# Altium PCB Copy of MultiVibrateur.PcbDoc
Units mil, origin at the board's own origin, x right, y up, seen from the top; angles counter-clockwise.
Board outline 1220 x 820 mil, 2 copper layers (Top Layer, Bottom Layer); 9 components, 6 nets, 20 pads, 2 vias.
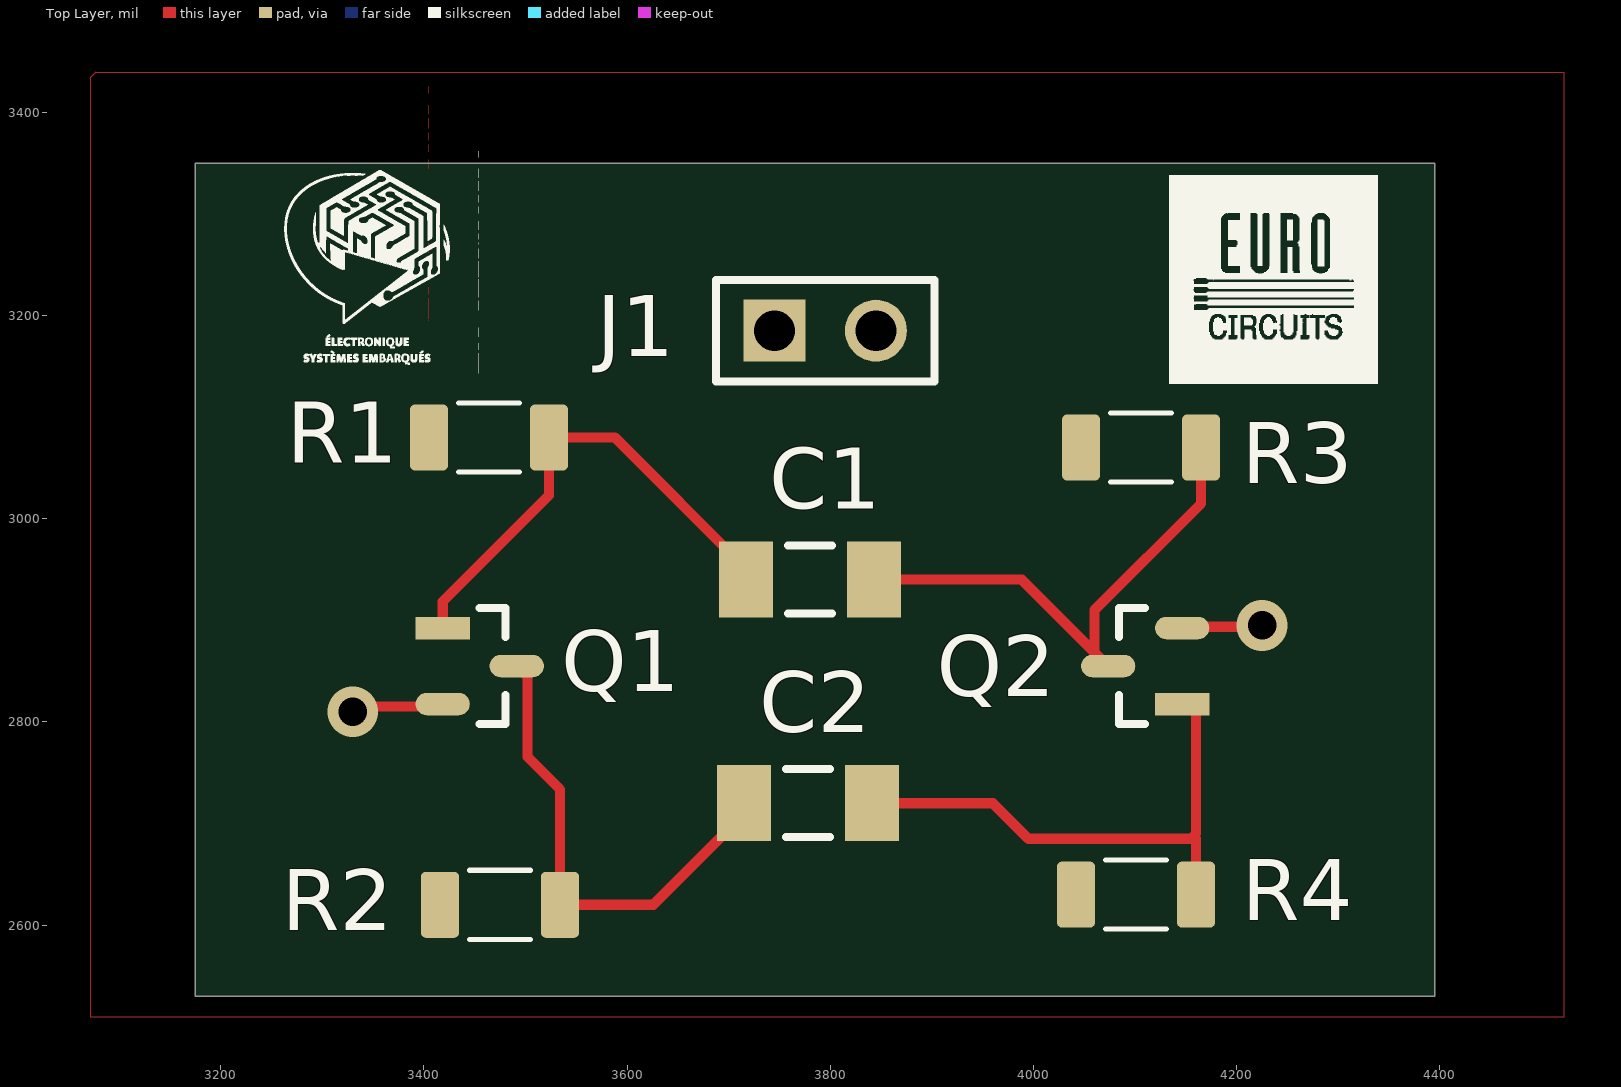
[diagram p0: Top Layer view]
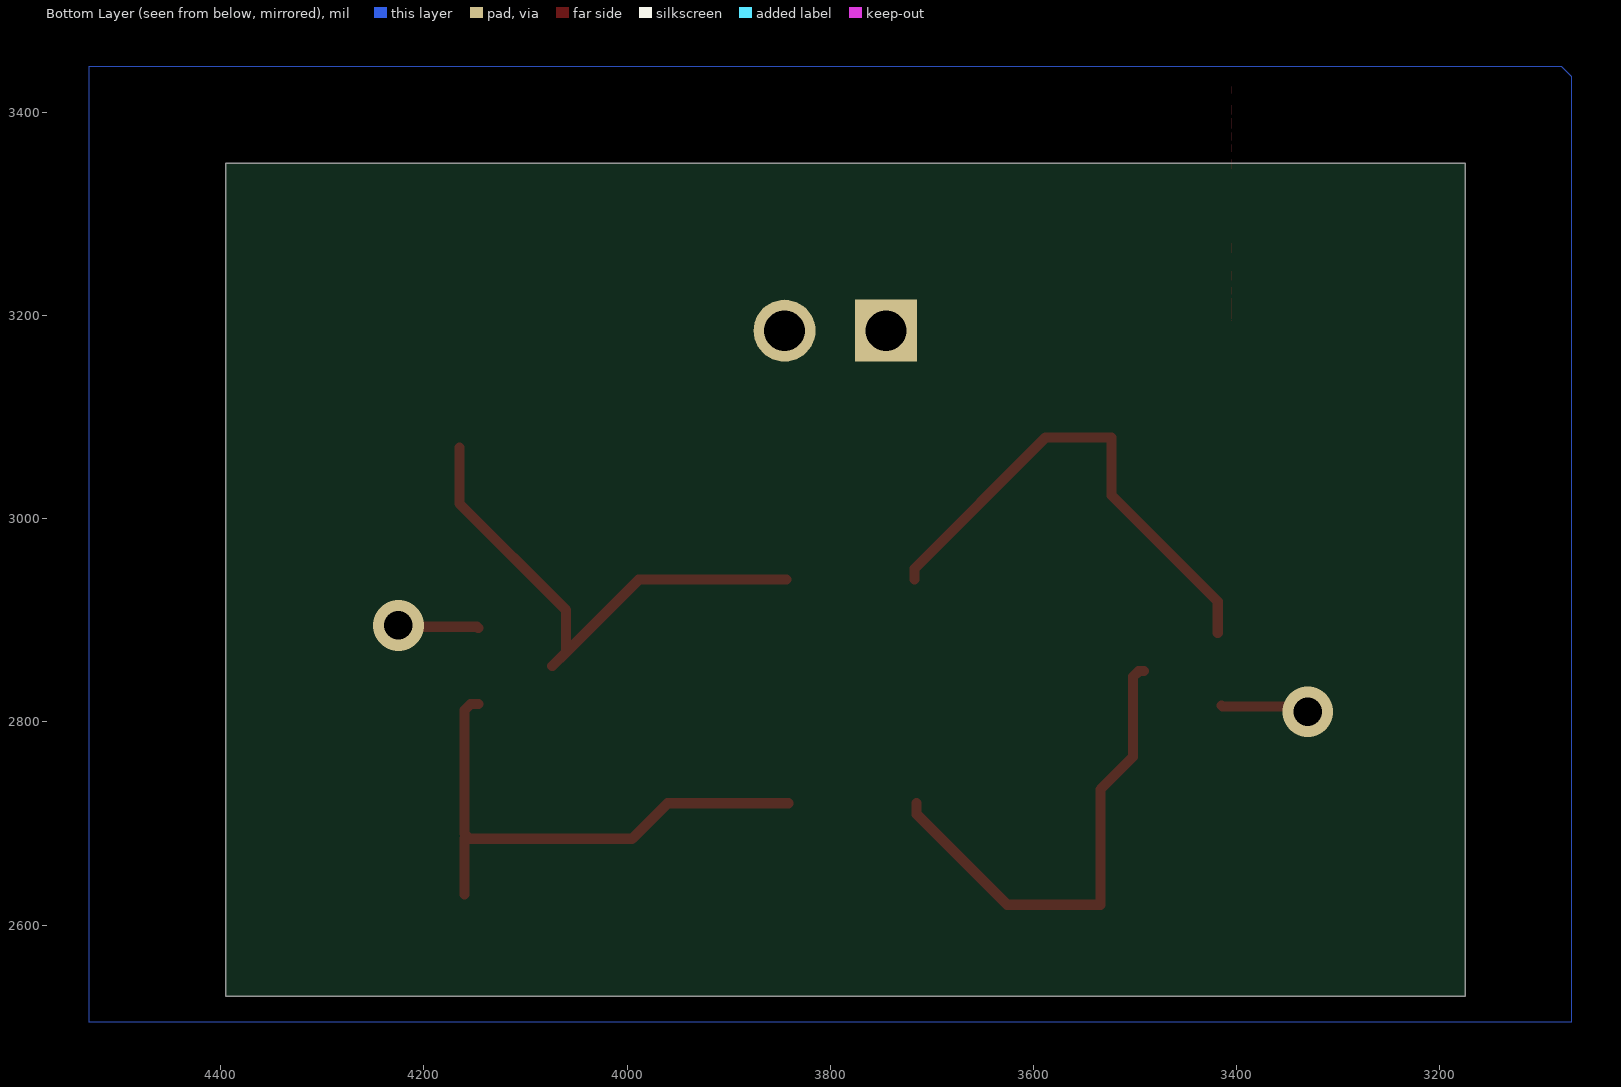
[diagram p1: Bottom Layer view, seen from below]

## Layer stack, top to bottom
Top Solder: solder mask 0.4, Solder Resist, Dk 3.5
Top Layer: signal copper 1.4
Dielectric 1: dielectric 12.6, FR-4, Dk 4.8
Bottom Layer: signal copper 1.4
Bottom Solder: solder mask 0.4, Solder Resist, Dk 3.5

## Board outline
3175,2530 3175,3350 4395,3350 4395,2530

## Design rules (kind name [scope] priority, off if disabled: settings)
Clearance [All] p1: gap=10 ignorepadtopadclearanceinfootprint=FALSE
PolygonConnect [All] p1: connectstyle=Relief reliefconductorwidth=10 reliefentries=4 polygonreliefangle="90 Angle" airgapwidth=10
RoutingVias [All] p1: holewidth=28 width=50 viastyle="Through Hole" minholewidth=28 minwidth=50 maxholewidth=28 maxwidth=50
SolderMaskExpansion [All] p1: expansion=0 istentingtop=FALSE
SupplyNets "Schematic Supply Nets_1" [InNet('12V')] p1: voltage=12.00
SupplyNets "Schematic Supply Nets" [InNet('GND')] p2: voltage=0.000
Width [All] p1: maxlimit=10 minlimit=10 preferedwidth=10
30 further rules are at their usual default settings.

## Classes and differential pairs
net class Power: GND

## Components (designator, comment, footprint, x,y, rotation, side; value= is the part's Value field where it differs from the comment)
C1 "22nF" CAPACITOR_1206 3780,2940 r0 top value=100nF
C2 "22nF" CAPACITOR_1206 3777.99,2720 r0 top value=100nF
J1 "2 Pins header" HEADER_2PIN_2_54 3745,3185 r0 top
Q1 "Transistor" TRANSISTOR_BC847 3455,2855 r0 top
Q2 "Transistor" TRANSISTOR_BC847 4110,2855 r180 top
R1 "100k" RESISTOR_1206 3464.06,3080 r180 top
R2 "1k" RESISTOR_1206 3475,2620 r180 top
R3 "1k" RESISTOR_1206 4105.94,3070 r180 top
R4 "100k" RESISTOR_1206 4100.94,2630 r180 top

## Footprints (in the part's own frame and the unit in brackets; to place one, negate y for a bottom-side part, rotate by r counter-clockwise, add the part's x,y. Pads: shape width x height; smd on the part's side, far side on the other; paste and mask are expansions set on the pad)
CAPACITOR_1206 [mm] "Chip Capacitor, Body 3.2x1.6mm, Height 1.7mm, IPC Low Density"
  rect 1.35x1.9 smd: 1(-1.6,0) 2(1.6,0)
  silkscreen extent -0.55,-0.85 0.55,0.85, body extent -1.7,-0.9 1.7,0.9, height 1.7
HEADER_2PIN_2_54 [mm] ".025 SQ Post Terminal Strip Assembly, 1x2 Pins, Vertical, 2.54mm Pitch, Male"
  rect 1.55x1.55 hole 1.02: 1(0,0)
  round 1.55 hole 1.02: 2(2.54,0)
  silkscreen extent -1.46,-1.27 4,1.27, body extent -1.4,-1.27 3.81,1.27, height 8.38
RESISTOR_1206 [mm]
  rrect25% 0.95x1.65 smd: 1(-1.5,0) 2(1.5,0)
  silkscreen extent -0.76,-0.86 0.76,0.86, body extent -1.6,-0.8 1.6,0.8, height 0.55
TRANSISTOR_BC847 [mm]
  rect 1.355x0.562 smd paste+0 mask+0: 1(-0.925,0.95)
  rrect100% 1.355x0.562 smd paste+0 mask+0: 2(-0.925,-0.95) 3(0.925,0)
  silkscreen extent 0,-1.45 0.65,1.45, body extent -1.85,-1.7 1.85,1.7, height 0.25

## Part data
C1 C2: library part Capacitor, Case-EIA=1206, Case-Metric=3216, Rated Voltage="100 V", Tolerance=Â±5%, Max Thickness="1.7 mm", Technology=SMT
J1: Manufacturer=Samtec, PartNumber=TSW-102-26-F-S, Temperature Range="-55 to 125 degC", ComponentLink1Description="Manufacturer URL", ComponentLink1URL=http://www.samtec.com, ComponentLink2Description=Datasheet, ComponentLink2URL=http://www.samtec.com/documents/webfiles/pdf/TSW_TH.PDF, ComponentLink3Description="Package Specification", ComponentLink3URL=http://www.samtec.com/documents/webfiles/cpdf/TSW-XXX-XX-XXX-X-XX-XXX-MKT.pdf, DatasheetVersion=F-214, Mounting Technology=Through-hole, Orientation=Vertical, PackageDescription=".025[0.64] SQ. Post Terminal Strip Assembly", PackageReference=TSW-102-26-XX-S, PackageVersion="DM, 8/1988", Pitch="2.54 mm", RoHS=True
R1 R2 R3 R4: library part Resistor
Q1 Q2: RoHS Compliant=Yes

## Via types
v1: diameter 50, hole 28, Top Layer to Bottom Layer, 2 vias

## Nets (pads, with @x,y where several pads share a name; then routed paths per layer and width w, separated by ;. In a path a pad name is that pad's centre, name@x,y a point inside that pad or via, vN(x,y) a via of type N, cw(c..) or ccw(c..) an arc to the next point about the centre after c; other vN are vias at no path point)
12V: J1.2 R1.2 R2.2 R3.2 R4.2
GND: J1.1 Q1.2 Q2.2 | length 167.1
  Top Layer w10: v1(3330,2810) 3335.27,2815.27 3413.84,2815.27 Q1.2@3414.86,2816.3 ; Q2.2 4147.74,2893.7 4223.7,2893.7 v1(4225,2895)
NetC1_1: C1.1 Q1.1 R1.1 | length 494.1
  Top Layer w10: Q1.1@3418.56,2887.4 3418.56,2918.56 3523.11,3023.11 R1.1 3587.83,3080 3717.01,2950.83 C1.1
NetC1_2: C1.2 Q2.3 R3.1 | length 510.7
  Top Layer w10: C1.2 3988.56,2940 4060,2868.56 ; Q2.3 4060,2868.56 ; R3.1 4165,3015 4060,2910 4060,2868.56
NetC2_1: C2.1 Q1.3 R2.1 | length 479.3
  Top Layer w10: Q1.3@3491.44,2850 3496.43,2850 3502.04,2844.39 3502.04,2765.6 3534.06,2733.59 R2.1 3625.83,2620 3715,2709.17 C2.1
NetC2_2: C2.2 Q2.1 R4.1 | length 528.2
  Top Layer w10: C2.2 3960,2720 3995,2685 4155,2685 4160,2690 4160,2811.53 4153.93,2817.6 Q2.1 ; R4.1 4160,2685

## Polygon pours and split planes (outlines as drawn)
GND on Bottom Layer "NONET_L02_P001" (solid, shelved, pour order 1): 3070,3435 3080,3445 4530,3445 4530,2505 3070,2505
12V on Top Layer "NONET_L01_P002" (solid, shelved, pour order 2): 4522.11,3439.52 4522.11,2509.52 3072.11,2509.52 3072.11,3434.52 3077.11,3439.52 3072.11,3434.52 3077.11,3439.52

## Other copper
Top Layer:
  region: 3404.91,3195 3404.91,3195.09 3405,3195.09 3405,3195
  region: 3404.91,3362.96 3404.91,3367.96 3405,3367.96 3405,3361.19 3404.91,3361.19 3404.91,3362.86
  region: 3404.91,3352.57 3404.91,3353.22 3405,3353.22 3405,3344.5 3404.91,3344.5 3404.91,3352.48
  region: 3405,3375.66 3405,3372.69 3404.91,3372.69 3404.91,3379.93 3405,3379.93 3405,3375.75
  region: 3405,3421.75 3405,3418.97 3404.91,3418.97 3404.91,3425 3405,3425 3405,3421.85
  region: 3405,3269.19 3405,3261.77 3404.91,3261.77 3404.91,3271.14 3405,3271.14 3405,3269.29
  region: 3404.91,3405.25 3404.91,3406.92 3405,3406.92 3405,3397.83 3404.91,3397.83 3404.91,3405.15
  region: 3405,3209.47 3405,3196.85 3404.91,3196.85 3404.91,3217.17 3405,3217.17 3405,3209.56
  region: 3405,3225.88 3405,3220.97 3404.91,3220.97 3404.91,3227.74 3405,3227.74 3405,3225.98
  region: 3405,3389.02 3405,3384.29 3404.91,3384.29 3404.91,3394.3 3405,3394.3 3405,3389.11
  region: 3405,3236.64 3405,3234.51 3404.91,3234.51 3404.91,3243.69 3405,3243.69 3405,3236.73

## Silkscreen, mask and mechanical layers (free items; w line width, h text height)
Top Overlay:
  drawing of 57 lines, arcs and shapes, not listed